# Altium PCB Interface-Board-v4.0.PcbDoc (part 3 of 3)
Units mil, origin at the board's own origin, x right, y up, seen from the top; angles counter-clockwise.
Board outline 1665.35 x 1665.35 mil, 4 copper layers (Top Layer, PWR, GND, Bottom Layer), stack 61.654 mil thick; 98 components, 76 nets, 345 pads, 193 vias.
Unrouted connection lines stored in the file: 69.
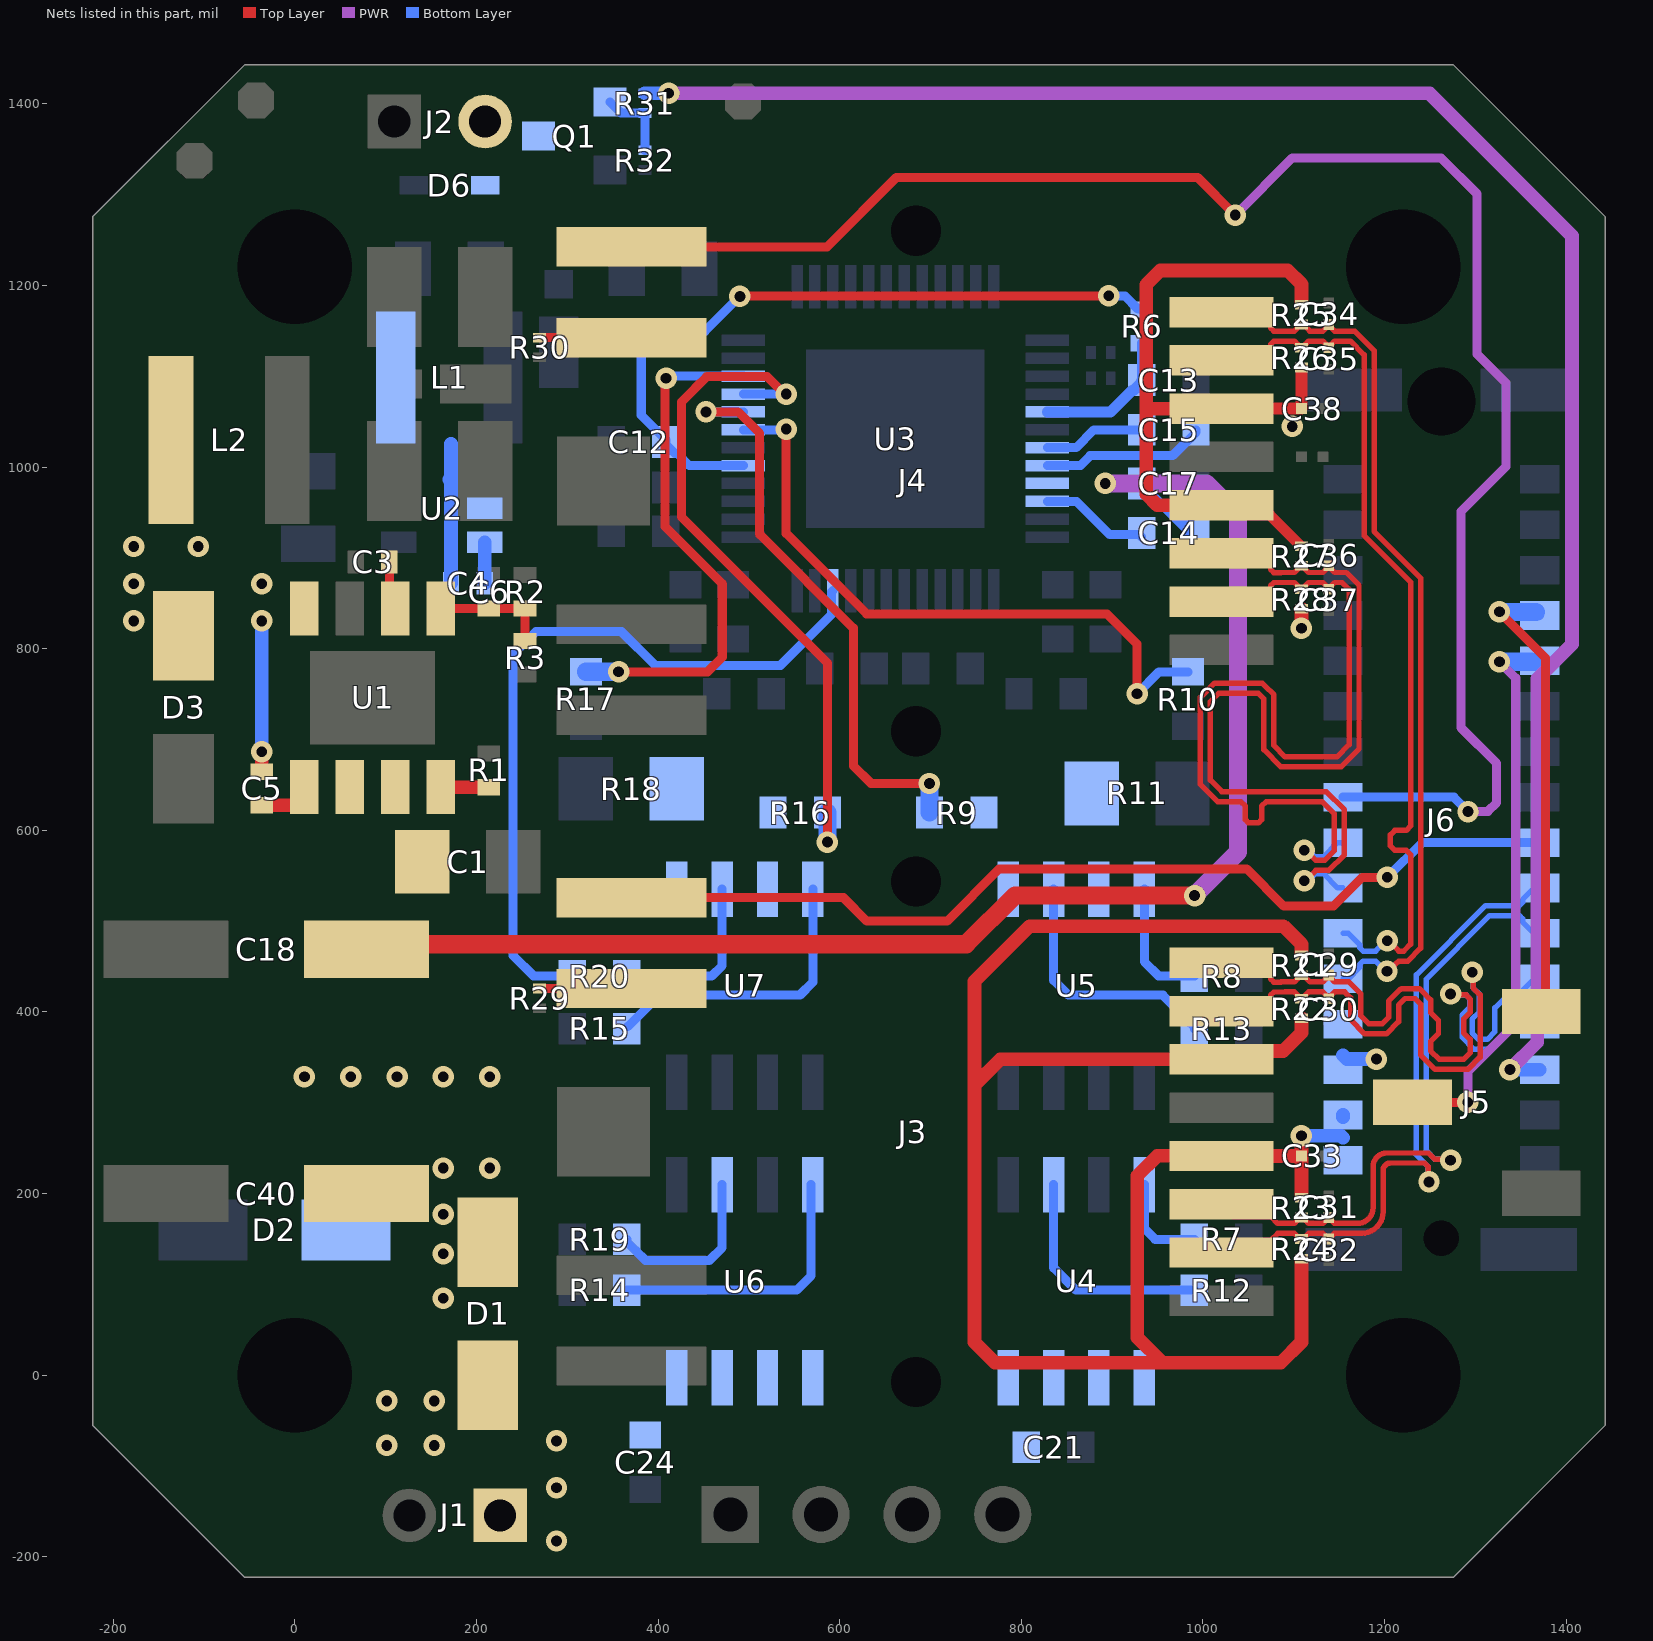
[diagram p4: the nets of this part, all layers, seen from the top]

## Via types
v1: diameter 23.62, hole 11.81, Top Layer to Bottom Layer, tented both sides, 193 vias

## Nets (pads, with @x,y where several pads share a name; then routed paths per layer and width w, separated by ;. In a path a pad name is that pad's centre, name@x,y a point inside that pad or via, vN(x,y) a via of type N, cw(c..) or ccw(c..) an arc to the next point about the centre after c; other vN are vias at no path point) (continued)
LB2: R20.2 U3.46 | length 832.6
  Bottom Layer w10: R20.2@305.56,439.59 262.92,439.59 240.38,462.14 240.38,793.8 265.4,818.82 359.74,818.82 396.96,781.61 534.88,781.61 591.15,837.87 591.15,862.65 U3.46@592.45,863.95
LINK0: J3.9 J6.A8 | length 1080.3
  Top Layer w10: J3.9@370.87,525.87 604.25,525.87 630.04,500.09 718.36,500.09 775.8,557.52 1048.23,557.52 1089.13,516.63 1143.79,516.63 1175.38,548.21 v1(1203.09,548.21)
  Bottom Layer w10: v1(1203.09,548.21) 1241.43,586.56 J6.A8@1370.83,586.56
LINK1: J4.9 J6.B9 | length 1923
  Top Layer w10: J4.9@370.87,1242.59 586.15,1242.59 662.62,1319.06 994.09,1319.06 v1(1035.56,1277.59)
  PWR w10: v1(1035.56,1277.59) 1098.56,1340.59 1262.1,1340.59 1301.92,1300.77 1301.92,1124.51 1333.89,1092.55 1333.89,1000.77 1284.06,950.94 1284.06,713.23 1323.48,673.81 1323.48,630.51 1313.78,620.81 1292.12,620.81 v1(1291.99,620.67)
  Bottom Layer w10: J6.B9@1154.29,636.56 1154.33,636.59 1276.34,636.59 1291.99,620.94 v1(1291.99,620.67)
NetC3_2: C3.2 U1.6 | length 59
  Top Layer w10: C3.2@104.06,900.59 104.06,850.75 U1.6@110.56,844.25
NetC4_1: C4.1 U2.6 | length 45.3
  Bottom Layer w15: C4.1@209.05,872.04 U2.6@209.05,917.32
NetC4_2: C4.2 L1.1 U2.5 | length 156.3
  Bottom Layer w15: 170.19,986.4 172.05,984.54 ; C4.2@172.05,872.04 172.05,984.54 ; 172.05,1025.76 172.05,984.54
NetC5_1: C5.1 U1.1 | length 60.7
  Top Layer w15: C5.1@-36.44,627.59 -0.23,627.59 10.56,638.38 U1.1@10.56,647.59
NetC5_2: C5.2 D3.1 L2.1 U1.8 | length 166
  Top Layer w15: C5.2@-36.44,664.59 v1(-36.44,686.59)
  Bottom Layer w15: v1(-36.44,686.59) v1(-36.44,830.59)
  other v1: -177.44,830.59 -177.44,871.59 -36.44,871.59 -177.44,912.59 -106.44,912.59
NetC6_1: C6.1 R2.1 R3.2 U1.5 | length 128.7
  Top Layer w10: U1.5@160.56,844.25 C6.1@213.56,844.25 R2.1@253.56,844.25 R3.2@253.56,808.59
NetC12_2: C12.2 R6.1 U3.5 | length 794.6
  Top Layer w10: v1@490.14,1188.3 895.89,1188.3 v1(896.23,1188.64)
  Bottom Layer w10: v1(490.14,1187.96) 451.59,1149.41 396.42,1149.41 381.46,1134.46 381.46,1057.32 408.7,1030.08 408.7,1025.08 418.56,1015.23 421.06,1015.23 434.54,1001.74 U3.5@494.02,1001.74 ; v1(896.23,1188.64) 896.34,1188.53 914.12,1188.53 928.57,1174.08 R6.1@932.07,1174.08
NetC13_2: C13.2 R6.2 U3.29 | length 159.7
  Bottom Layer w10: C13.2@932.56,1095.84 R6.2@932.56,1136.59
  Bottom Layer w12: U3.29@828.67,1060.8 898.41,1060.8 921.95,1084.34 923.56,1084.34 932.56,1093.34 C13.2@932.56,1094.95
NetC14_1: C14.1 U3.34 | length 120.2
  Bottom Layer w10: U3.34@828.67,962.37 860.67,962.37 897.44,925.59 929.97,925.59 C14.1@932.56,923
NetC15_1: C15.1 U3.31 | length 112
  Bottom Layer w10: U3.31@828.67,1021.43 860.36,1021.43 880.04,1041.11 C15.1@932.56,1041.11
NetC15_2: C15.2 U3.32 | length 181.7
  Bottom Layer w10: U3.32@828.67,1001.74 865,1001.74 875.85,1012.59 966.54,1012.59 992.56,1038.61 C15.2@992.56,1041.11
NetJ3_10: J3.10 R29.2 | length 101.3
  Top Layer w10: R29.2@269.54,425.87 J3.10@370.87,425.87
NetJ4_10: J4.10 R30.2 | length 101.3
  Top Layer w10: R30.2@269.54,1142.59 J4.10@370.87,1142.59
NetQ1_1: Q1.1 R31.2 R32.2 | length 82.7
  Bottom Layer w10: Q1.1@347.3,1401.99 358.44,1390.85 359.35,1389.94 R31.2@385.56,1389.94 ; R32.2@385.56,1348.84 R31.2@385.56,1388.25
NetR1_2: R1.2 U1.4 | length 53
  Top Layer w15: U1.4@160.56,647.59 R1.2@213.56,647.59
NetR7_2: R7.2 U4.4 | length 108.3
  Bottom Layer w10: U4.4@935.56,209.89 935.56,161.59 947.56,149.59 R7.2@990.56,149.59
NetR8_2: R8.2 U5.4 | length 141.4
  Bottom Layer w10: U5.4@935.56,535.19 935.56,455.35 951.31,439.59 R8.2@990.56,439.59
NetR9_2: R9.2 R11.2 U5.1 U5.3
NetR12_1: R12.1 U4.2 | length 256.8
  Bottom Layer w10: U4.2@835.56,209.89 835.56,118.29 860.25,93.59 R12.1@990.56,93.59
NetR13_1: R13.1 U5.2 | length 278.9
  Bottom Layer w10: U5.2@835.56,535.19 835.56,434.92 852.01,418.47 956.02,418.47 990.56,383.93 R13.1@990.56,381.43
NetR14_2: R14.2 U6.4 | length 309.9
  Bottom Layer w10: R14.2@365.56,93.59 552.59,93.59 568.56,109.56 U6.4@568.56,209.89
NetR15_2: R15.2 U7.4 | length 326.5
  Bottom Layer w10: R15.2@366.56,383.93 401.34,418.71 556.33,418.71 570.56,432.94 U7.4@570.56,535.19
NetR16_2: R16.2 R18.2 U7.1 U7.3
NetR19_1: R19.1 U6.2 | length 191.4
  Bottom Layer w10: R19.1@365.56,149.59 365.56,147.09 R19.1@375.56,137.09 ; R19.1@375.58,137.09 386.36,126.31 456.42,126.31 470.56,140.45 U6.2@470.56,209.89
NetR20_1: R20.1 U7.2 | length 193.9
  Bottom Layer w10: R20.1@365.56,439.59 459.06,439.59 470.56,451.09 U7.2@470.56,535.19
PUMP: J6.A3 R31.1 | length 2065.1
  PWR w15: v1(411.56,1411.59) 1249.64,1411.59 1406.56,1254.68 1406.56,804.95 1368.35,766.74 1368.35,366.74 v1(1338.16,336.56)
  Bottom Layer w15: R31.1@385.56,1411.59 v1(411.56,1411.59) ; v1(1338.16,336.56) J6.A3@1370.83,336.56
PUMP-PWM: D6.1 J2.2 Q1.3
RXA_N: C32.1 J3.7 J6.A7 R24.2 | length 741.1
  Top Layer w6: J3.7@1020.47,135.13 1034.2,148.86 1075.13,148.86 1082.48,156.2 1090.5,156.2 1090.55,156.25 1100.76,156.25 1104.27,152.74 1104.27,152.24 1106.59,149.92 R24.2@1108.56,149.92 1110.53,149.92 1112.84,152.24 1112.84,152.74 1116.36,156.25 1132.23,156.25 C32.1@1138.56,149.92 1144.89,156.25 1174.86,156.25 ccw(c1174.86,179.85) 1198.46,179.85 1198.46,225.25 cw(c1206.86,225.25) 1206.86,233.65 1244.14,233.65 1247.97,229.81 1247.97,213.82 v1(1249.01,212.78)
  Bottom Layer w6: v1(1249.01,212.78) 1247.97,213.82 1247.97,229.81 1235.08,242.71 1235.08,440.82 1311.32,517.06 1348.66,517.06 1352.17,520.57 1352.17,523.81 1364.92,536.56 J6.A7@1370.83,536.56
RXA_P: C31.1 J3.6 J6.A6 R23.2 | length 722.9
  Top Layer w6: J3.6@1020.47,188.28 1034.2,174.54 1074.98,174.54 1082.27,167.25 1100.76,167.25 1104.27,170.77 1104.27,171.27 1106.59,173.58 R23.2@1108.56,173.58 1110.53,173.58 1112.84,171.27 1112.84,170.77 1116.36,167.25 1132.23,167.25 C31.1@1138.56,173.58 1144.89,167.25 1170.31,167.25 ccw(c1170.31,184.41) 1187.46,184.41 1187.46,229.81 cw(c1202.3,229.81) 1202.3,244.65 1248.7,244.65 1255.75,237.59 1271.75,237.59 v1(1272.78,236.56)
  Bottom Layer w6: v1(1272.78,236.56) 1271.75,237.59 1255.75,237.59 1246.08,247.26 1246.08,436.26 1315.88,506.06 1348.66,506.06 1352.17,502.54 1352.17,499.3 1364.92,486.56 J6.A6@1370.83,486.56
RXB_N: C37.1 J4.7 J6.B8 R28.2 | length 1011.3
  Top Layer w6: J4.7@1020.47,851.84 1060.83,851.84 1074.56,865.58 1074.56,869.4 1078.07,872.92 1090.5,872.92 1100.76,872.93 1104.27,869.41 1104.27,867.91 1106.59,865.59 R28.2@1108.56,865.59 1110.53,865.59 1112.84,867.91 1112.84,869.41 1116.36,872.93 1132.14,872.93 1135.65,869.41 1135.65,868.5 C37.1@1138.56,865.59 1141.46,868.5 1141.46,869.41 1144.98,872.93 1153.46,872.93 1160.95,865.44 1160.95,694.27 1147.68,681 1090.5,681 1078.07,693.42 1078.07,749.43 1068.6,758.9 1065.38,762.12 1012.96,762.12 997.23,746.4 997.23,650.66 1016.25,631.64 1041.65,631.64 1046.68,626.62 1046.68,611.82 1050.19,608.3 1061.26,608.3 1064.78,611.82 1064.78,626.55 1069.87,631.64 1131.27,631.64 1144.74,618.17 1144.74,577.66 1133.98,566.9 1124.34,566.9 1113.02,578.21 v1(1111.56,578.21)
  Bottom Layer w6: v1(1111.56,578.21) 1116.33,578.21 1123.73,570.81 1132.64,570.81 1148.39,586.56 J6.B8@1154.29,586.56
RXB_P: C36.1 J4.6 J6.B7 R27.2 | length 1011.3
  Top Layer w6: J4.6@1020.47,904.99 1060.83,904.99 1074.56,891.26 1074.56,887.43 1078.07,883.92 1085.94,883.92 1100.76,883.93 1104.27,887.44 1104.27,888.95 1106.59,891.26 R27.2@1108.56,891.26 1110.53,891.26 1112.84,888.95 1112.84,887.44 1116.36,883.93 1132.14,883.93 1135.65,887.44 1135.65,888.36 C36.1@1138.56,891.26 1141.46,888.36 1141.46,887.44 1144.98,883.93 1158.02,883.93 1171.95,869.99 1171.95,689.71 1152.24,670 1085.94,670 1067.07,688.87 1067.07,744.88 1060.83,751.12 1017.52,751.12 1008.23,741.84 1008.23,655.21 1020.81,642.64 1053.31,642.64 1135.82,642.64 1155.74,622.72 1155.74,573.1 1138.54,555.9 1124.34,555.9 1113.02,544.59 v1(1111.56,544.59)
  Bottom Layer w6: v1(1111.56,544.59) 1116.17,544.59 1123.88,552.3 1132.64,552.3 1148.39,536.56 J6.B7@1154.29,536.56
SRAH: R9.1 U3.8 | length 642.8
  Top Layer w10: v1(452.79,1060.8) 488.18,1060.8 511.79,1037.19 511.79,926.08 615.16,822.71 615.16,670.99 634.56,651.59 v1(698.86,651.59)
  Bottom Layer w10: v1(452.79,1060.8) U3.8@494.02,1060.8
  Bottom Layer w20: R9.1@698.86,619.59 v1(698.86,651.59)
SRAL: R10.1 U3.7 | length 719.5
  Top Layer w10: v1@541.11,1041.53 541.11,927.06 629.69,838.48 894.2,838.48 927.56,805.13 v1(927.56,750.43)
  Bottom Layer w10: U3.7@494.02,1041.11 540.34,1041.11 v1(541.11,1041.88) ; v1(927.56,750.43) 951.72,774.59 R10.1@983.56,774.59
SRBH: R16.1 U3.9 | length 765.6
  Top Layer w10: v1(541.11,1080.48) 539.39,1080.48 520.15,1099.72 453.68,1099.72 440.56,1086.59 440.56,1086.48 425.98,1071.9 425.98,945.02 586.56,784.44 v1(586.56,587.11)
  Bottom Layer w10: U3.9@494.02,1080.48 v1(541.11,1080.48)
  Bottom Layer w20: v1(586.56,587.11) R16.1@586.56,619.59
SRBL: R17.1 U3.10 | length 576
  Top Layer w10: v1@357.23,774.59 454.5,774.59 470.68,790.77 470.68,871.53 407.56,934.65 407.56,1096.57 v1(408.84,1097.85)
  Bottom Layer w10: v1(408.84,1097.85) 411.16,1100.17 U3.10@494.02,1100.17
  Bottom Layer w20: R17.1@320.56,774.59 v1(356.56,774.59)
TXA_N: C30.1 J3.2 J6.A5 R22.2 | length 734.8
  Top Layer w6: J3.2@1020.47,400.88 1060.83,400.88 1074.56,414.61 1074.56,418.44 1078.07,421.95 1090.5,421.95 1090.65,422.1 1100.76,422.1 1104.27,418.59 1104.27,416.92 1106.59,414.61 R22.2@1108.56,414.61 1110.53,414.61 1112.84,416.92 1112.84,418.58 1116.36,422.1 1132.14,422.1 1135.65,418.58 1135.65,417.51 C30.1@1138.56,414.61 1141.46,417.51 1141.46,418.58 1144.98,422.1 1156.09,422.1 1162.64,415.55 1162.64,391.46 1178.2,375.9 1202.09,375.9 1215.56,389.36 1215.56,407.52 1222.84,414.8 1233.83,414.8 1239.92,408.7 1239.92,352.62 1255.82,336.73 1291.83,336.73 1305.39,350.29 1305.39,388.68 1305.39,418.76 1297.6,426.56 1297.6,442.56 v1(1296.56,443.59)
  Bottom Layer w6: v1(1296.56,443.59) 1297.6,442.56 1297.6,426.56 1304.6,419.56 1304.6,400.14 1296.52,392.06 1296.52,376.81 1303.4,369.93 1313.29,369.93 1321.61,378.24 1321.61,404.43 1334.23,417.06 1348.66,417.06 1352.17,420.57 1352.17,423.81 1364.92,436.56 J6.A5@1370.83,436.56
TXA_P: C29.1 J3.1 J6.A4 R21.2 | length 728.4
  Top Layer w6: J3.1@1020.47,454.02 1060.83,454.02 1074.56,440.29 1074.56,436.46 1078.07,432.95 1085.94,432.95 1086.09,433.1 1100.76,433.1 1104.27,436.61 1104.27,438.28 1106.59,440.59 R21.2@1108.56,440.59 1110.53,440.59 1118.02,433.1 1132.14,433.1 1135.65,436.61 1135.65,437.69 C29.1@1138.56,440.59 1141.46,437.69 1141.46,436.61 1144.98,433.1 1160.65,433.1 1173.64,420.1 1173.64,396.01 1182.76,386.9 1197.53,386.9 1204.56,393.92 1204.56,412.07 1216.71,424.23 ccw(c1202.76,444.75) 1218.78,425.79 1238.38,425.8 1241.61,422.57 1250.92,413.26 1250.92,399.34 1259.46,390.8 1259.46,376.12 1250.92,367.58 1250.92,357.18 1260.37,347.73 1287.27,347.73 1294.39,354.85 1294.39,369.91 1287.27,377.03 1287.27,392.33 1294.39,399.46 1294.39,414.2 1289.82,418.78 1273.82,418.78 v1(1272.78,419.82)
  Bottom Layer w6: v1(1272.78,419.82) 1273.82,418.78 1289.82,418.78 1293.6,415 1293.6,404.7 1285.52,396.62 1285.52,372.26 1298.85,358.93 1317.85,358.93 1332.61,373.68 1332.61,399.88 1338.78,406.06 1348.66,406.06 1352.17,402.54 1352.17,399.3 1364.92,386.56 J6.A4@1370.83,386.56
TXB_N: C35.1 J4.2 J6.B6 R26.2 | length 990.1
  Top Layer w6: J4.2@1020.47,1117.59 1060.83,1117.59 1074.56,1131.32 1074.56,1135.15 1078.07,1138.67 1090.5,1138.67 1100.76,1138.67 1104.27,1135.16 1104.27,1133.66 1106.59,1131.34 R26.2@1108.56,1131.34 1110.53,1131.34 1112.84,1133.66 1112.84,1135.16 1116.36,1138.67 1132.14,1138.67 1135.65,1135.16 1135.65,1134.25 C35.1@1138.56,1131.34 1141.46,1134.25 1141.46,1135.16 1144.98,1138.67 1162.57,1138.67 1177.56,1123.69 1177.56,924.63 1228.92,873.27 1228.92,604.82 1224.06,599.97 1211.46,599.97 1206.42,594.93 1206.42,583 1211.21,578.21 1223.89,578.21 1228.92,573.18 1228.92,474.76 1221.21,467.06 1215.87,467.06 1204.56,478.37 v1(1203.09,478.37)
  Bottom Layer w6: J6.B6@1154.29,486.56 1160.2,486.56 1172.94,473.81 1172.94,470.57 1176.46,467.06 1190.32,467.06 1201.63,478.37 v1(1203.09,478.37)
TXB_P: C34.1 J4.1 J6.B5 R25.2 | length 991.7
  Top Layer w6: J4.1@1020.47,1170.74 1060.83,1170.74 1074.56,1157.01 1074.56,1153.18 1078.07,1149.67 1085.94,1149.67 1100.76,1149.67 1104.27,1153.19 1104.27,1154.69 1106.59,1157.01 R25.2@1108.56,1157.01 1110.53,1157.01 1117.86,1149.67 1132.14,1149.67 1135.65,1153.19 1135.65,1154.1 C34.1@1138.56,1157.01 1141.46,1154.1 1141.46,1153.19 1144.98,1149.67 1167.13,1149.67 1188.56,1128.24 1188.56,929.18 1239.92,877.82 1239.92,470.21 1225.77,456.06 1215.87,456.06 v1(1202.76,444.75)
  Bottom Layer w6: J6.B5@1154.29,436.56 1160.2,436.56 1172.94,449.3 1172.94,452.54 1176.46,456.06 1190.32,456.06 1201.62,444.75 v1(1202.76,444.75)
UART-RX: J5.1 J6.A13 | length 509
  Top Layer w10: v1(1326.56,840.59) 1377.19,789.96 1377.19,405.17 J5.1@1372.5,400.48
  Bottom Layer w10: J6.A13@1366.79,840.59 J6.A13@1370.83,836.56
  Bottom Layer w20: v1(1326.56,840.59) J6.A13@1366.79,840.59
UART-TX: J5.2 J6.A12 | length 620.3
  Top Layer w10: J5.2@1230.88,300.59 J5.2@1230.77,300.48 v1(1291.83,300.48)
  PWR w10: v1(1291.83,300.48) 1291.83,334.28 1344.56,387.01 1344.56,767.59 v1(1326.56,785.59)
  Bottom Layer w10: J6.A12@1369.86,785.59 J6.A12@1370.83,786.56
  Bottom Layer w20: v1(1326.56,785.59) J6.A12@1369.86,785.59
VDDTXRX1: C33.1 J3.3 J3.5 J6.B1 J6.B2 R21.1 R22.1 R23.1 R24.1 | length 2190.8
  Top Layer w15: J3.5@1020.47,241.43 C33.1@1108.56,241.43 ; J3.5@1020.47,241.43 949.67,241.46 927.81,219.6 927.81,41.56 955.78,13.59 ; R24.1@1108.56,125.27 1108.56,36.5 1085.65,13.59 955.78,13.59 ; R23.1@1108.56,197.99 C33.1@1108.56,241.43 ; v1(1108.56,263.59) C33.1@1108.56,241.43 ; R22.1@1108.56,392.95 1108.56,377.07 1088.45,356.96 1029.7,356.96 J3.3@1020.47,347.73 776.81,347.73 748.56,319.47 ; R21.1@1108.56,464.63 1108.56,474.71 1088.68,494.59 809.39,494.59 748.56,433.76 748.56,319.47 ; 748.56,319.47 748.56,36.15 771.12,13.59 955.78,13.59
  Bottom Layer w10: J6.B2@1154.29,286.56 J6.B2@1154.33,286.59
  Bottom Layer w15: v1(1108.56,263.59) 1152.25,263.59 1154.29,261.56 ; J6.B2@1154.33,283.92 J6.B2@1154.33,286.59
VDDTXRX2: C38.1 J4.3 J4.5 J6.B3 J6.B4 R25.1 R26.1 R27.1 R28.1 | length 906
  Top Layer w12: J4.5@1020.47,958.14 1031.2,947.41 1073.71,947.41 1107.27,913.84 R27.1@1107.27,913.6
  Top Layer w13: J4.3@1020.47,1064.44 C38.1@1108.56,1064.44 R26.1@1108.56,1107
  Top Layer w15: J4.5@1020.47,958.14 949.61,958.14 937.56,970.2 937.56,1064.44 ; J4.3@1020.47,1064.44 937.56,1064.44 ; v1(1098.49,1044.83) 1098.49,1047.16 v1@1100.4,1049.07 ; v1(1108.56,822.59) R28.1@1108.56,843.94 ; R25.1@1108.56,1181.86 1108.56,1201.59 1093.56,1216.59 953.13,1216.59 937.56,1201.02 937.56,1064.44
  Bottom Layer w15: 1154.29,352.3 1158.45,348.15 v1(1191.1,348.15)
VIN: D1.2 J1.1
  other v1: 288.19,-182.64 288.19,-123.85 101.25,-77.4 153.56,-77.4 288.19,-72.41 101.25,-28.41 153.56,-28.41
VM: C1.2 C14.2 C17.2 C18.1 C21.1 C24.1 C40.1 D1.1 D2.1 U1.2 U1.3 U3.33 U4.5 U4.6 U4.7 U4.8 U6.5 U6.6 U6.7 U6.8 | length 1613.7
  Top Layer w20: C18.1@101.03,474.59 739.34,474.59 792.96,528.21 v1(990.87,528.21)
  PWR w20: v1(892.61,982.06) 1003.74,982.06 1038.69,947.11 1038.69,576.04 v1(990.87,528.21)
  Bottom Layer w10: C17.2@932.56,982.06 932.56,979.56 942.56,969.56 943.98,969.56 982.49,931.05 C14.2@982.49,923.01 ; 963.24,950.31 C14.2@982.56,940.09
  other v1: 163.56,84.6 163.56,133.59 163.56,177.07 163.56,228.06 214.54,228.06 10.61,328.59 61.59,328.59 112.57,328.59 163.56,328.59 214.54,328.59
pads on no net: J3.11 J3.12 J3.MH1 J3.MH2 J4.11 J4.12 J4.MH1 J4.MH2 J6.A16 J6.B16 J6.MH J6.MH1 U3.25

## Polygon pours and split planes (outlines as drawn)
BMA1 on Bottom Layer "BMA1_L04_P007" (solid, pour order 7): 952.56,247.4 916.75,247.4 916.75,144.59 861.56,144.59 861.56,386.74 873.75,398.93 940.22,398.93 952.56,386.59
VM on Bottom Layer "VM_L04_P023" (solid, pour order 23): 350.91,-96.91 253.41,0.59 80.56,0.59 20.74,60.41 -6.68,60.41 -6.68,378.09 189.56,378.09 255.56,312.09 255.56,88.59 275.56,68.59 975.56,68.59 975.56,-49.41 825.56,-49.41 825.56,-96.91 405,-96.91
GND on Bottom Layer "GND_L04_P040" (solid, remove dead copper, pour order 40): -222.44,-55.41 -55.41,-222.44 1275.88,-222.44 1442.91,-55.41 1442.91,1275.88 1275.88,1442.91 -55.41,1442.91 -222.44,1275.88
VIN on Bottom Layer "VIN_L04_P032" (solid, pour order 32): 249.41,-9.41 350.91,-110.91 350.91,-204.41 187.56,-204.41 187.56,-104.41 73.79,-104.41 73.79,-9.41
3V3 on Bottom Layer "	" (solid, pour order 26): 190.19,1248.59 190.19,1025.76 256,1025.76 256,1173 264.39,1181.39 406,1181.39 406,1248.59
NetC4_2 on Bottom Layer "NETC4_2_L04_P025" (solid, pour order 25): 243.37,970.59 243.37,937.59 142.56,937.59 142.56,1025.76 89.48,1025.76 89.48,1171.43 182,1171.43 182,970.59
12V on Bottom Layer "12V_L04_P024" (solid, pour order 24): 79,1015.59 79,1173.75 94.87,1188.59 94.87,1280.16 109.16,1294.45 146.57,1294.45 146.57,1442.91 -36.32,1442.91 -222.44,1256.8 -222.44,1128 -77.44,1128 -77.44,975.59 22.56,975.59 50.22,947.93 58.15,940 134.24,940 134.24,1015.59
3V3 on Bottom Layer "3V3_L04_P018" (solid, pour order 18): 756,1230.25 740.25,1230.25 736.54,1226.54 736.54,1174.58 684.57,1174.58 684.57,1226.54 699.54,1226.54 717,1244 717,1277 704.26,1289.74 704.26,1306.76 756,1306.76
12V on Bottom Layer "12V_L04_P017" (solid, pour order 17): 452.78,956.07 445.69,948.99 445.69,929.69 427.8,911.8 393.56,911.8 393.56,988.36 450.63,988.36 518.04,988.36 518.04,956.07
VM on Bottom Layer "VM_L04_P010" (solid, pour order 10): 804.65,975.76 869.36,975.76 880.56,964.56 947.56,964.56 947.56,999.56 879.67,999.56 868.47,988.36 804.65,988.36
NetR9_2 on Bottom Layer "NETR9_2_L04_P009" (solid, pour order 9): 911.35,683.59 829.7,683.59 735.56,683.59 735.56,502.07 745.56,492.07 902.04,492.07 911.35,501.39
NetR16_2 on Bottom Layer "NETR16_2_L04_P008" (solid, pour order 8): 370.56,680.59 370.56,502.07 380.56,492.07 535.67,492.07 546.35,502.75 546.35,680.59 482.37,680.59
BMA2 on Bottom Layer "BMA2_L04_P006" (solid, pour order 6): 852.56,247.4 816.75,247.4 816.75,144.59 761.56,144.59 761.56,386.74 773.75,398.93 840.22,398.93 852.56,386.59
BMB1 on Bottom Layer "BMB1_L04_P001" (solid, pour order 1): 577.56,144.59 587.56,154.59 587.56,386.59 575.22,398.93 508.75,398.93 496.56,386.74 496.56,151.28 503.25,144.59
BMB2 on Bottom Layer "BMB2_L04_P000" (solid, pour order 0): 477.56,144.59 487.56,154.59 487.56,386.59 475.22,398.93 408.75,398.93 396.56,386.74 396.56,151.28 403.25,144.59
12V on PWR "12V_L02_P031" (solid, pour order 31): 202.22,1082.46 233.86,1114.09 482.27,1114.09 513.56,1082.8 513.56,908.92 513.56,803.28 536.58,780.26 536.58,538.12 426.05,427.59 -222.44,427.59 -222.44,1275.88 -55.41,1442.91 158.56,1442.91 158.56,1335.59 115.56,1292.59 115.56,964.4 85.56,934.4 85.56,890.08 106.64,869 179.97,869 202.22,891.25
3V3 on PWR "3V3_L02_P034" (solid, remove dead copper, pour order 34): 192.39,1088.64 230.34,1126.59 484.81,1126.59 526.56,1084.85 526.56,822.83 578.95,822.83 601.56,800.22 601.56,504.59 536.58,439.61 536.58,426.59 1008.56,426.59 1008.56,-222.44 1275.88,-222.44 1442.91,-55.41 1442.91,1275.88 1275.88,1442.91 173.38,1442.91 173.38,1327.42 128.56,1282.59 128.56,962.59 96.56,930.59 96.56,893.59 109.56,880.59 178.56,880.59 192.39,894.42
VM on PWR "VM_L02_P033" (solid, pour order 33): 49.49,31.59 49.49,-199.41 -78.44,-199.41 -222.44,-55.41 -222.44,408.59 350.56,408.59 350.56,31.59
VIN on PWR "VIN_L02_P030" (solid, pour order 30): 350.56,14.59 350.56,-222.44 176.56,-222.44 176.56,-104.41 73.79,-104.41 73.79,14.59
VDDTXRX2 on PWR "VDDTXRX2_L02_P003" (solid, pour order 3): 1141.56,1093.59 1197.39,1037.76 1197.39,863.39 1182,848 1182,395.59 1207.43,395.59 1207.43,320.59 1109.06,320.59 1109.06,487.59 1056.56,487.59 1056.56,663.59 1083.56,690.59 1083.56,1093.59
BMA2 on PWR "BMA2_L02_P028" (solid, pour order 28): 636.56,-222.44 728.49,-222.44 728.49,-102.83 736.32,-95 855.56,-95 855.56,408.59 745.56,408.59 636.56,408.59
BMA1 on PWR "BMA1_L02_P019" (solid, pour order 19): 866.56,-108.14 739.56,-108.14 739.56,-222.44 991.56,-222.44 991.56,408.59 866.56,408.59
BMB1 on PWR "BMB1_L02_P005" (solid, pour order 5): 501.41,-59.26 527.56,-85.41 527.56,-222.44 626.56,-222.44 626.56,408.75 501.41,408.75
BMB2 on PWR "BMB2_L02_P004" (solid, pour order 4): 489.56,408.59 489.56,-64.41 515.56,-90.41 515.56,-222.44 369.56,-222.44 369.56,408.59
VM on Top Layer "VM_L01_P015" (solid, pour order 15): 44.77,593.59 -26.44,593.59 -26.44,55.59 126.56,55.59 274.95,55.59 274.95,255.59 226.06,255.59 226.06,504.22 175.56,504.22 175.56,600.59 126.72,600.59 126.72,676.84 126.35,677.22 44.77,677.22
12V on Top Layer "12V_L01_P021" (solid, pour order 21): -63.33,1121.54 -63.32,929.61 140.56,929.61 140.56,1425.59 40.56,1425.59 40.56,1326.95 -29.28,1326.95 -85.44,1270.79 -85.44,1143.66
GND on Top Layer "GND_L01_P035" (solid, remove dead copper, pour order 35): 420.56,-222.44 420.56,-88.41 842.56,-88.41 842.56,-222.44 1275.88,-222.44 1442.91,-55.41 1442.91,1275.88 1275.88,1442.91 -55.41,1442.91 -222.44,1275.88 -222.44,-55.41 -55.41,-222.44
VIN on Top Layer "VIN_L01_P022" (solid, pour order 22): 275.01,-34.41 313.56,-34.41 313.56,-222.44 187.56,-222.44 187.56,-104.41 73.79,-104.41 73.79,38.06 275.01,38.06
GND on Top Layer "GND_L01_P020" (solid, pour order 20): -61.44,607.64 -192.52,607.64 -192.52,749.59 -81.44,749.59 -73.44,757.59 -73.44,797.36 224.29,797.36 241.06,780.59 273.56,780.59 273.56,675.59 193.56,675.59 193.56,694.48 -6.33,694.48 -22.44,710.59 -50.44,710.59 -61.44,699.59
GND on GND "GND_L03_P038" (solid, pour order 38): -222.44,-55.41 -55.41,-222.44 1275.88,-222.44 1442.91,-55.41 1442.91,1275.88 1275.88,1442.91 -55.41,1442.91 -222.44,1275.88

## Other copper
Top Layer:
  rectangle net VDDTXRX2: 1085.95,1032.59 1109.56,1071.59
  rectangle net 3V3: 317,1171.59 453.54,1212.59
  rectangle net GND: 67.87,-199.41 179.4,-112.56
  rectangle net BMB2: 435.56,-204.41 525.56,-106.41
  rectangle net BMB1: 535.56,-204.41 625.56,-106.41
  rectangle net BMA2: 635.56,-204.41 725.56,-106.41
  rectangle net BMA1: 735.56,-204.41 825.56,-106.41
  rectangle net VIN: 187.56,-199.41 288.19,-72.41
  rectangle net 12V: 40.56,1311.59 140.56,1425.59
  rectangle net NetC5_2: -212.25,765.12 -93.47,1135.99
  rectangle net NetC5_2: -192.52,809 26.35,885
  pour cut-out: 281.19,500.39 281.19,491.92 324,491.92 324,500.39
  pour cut-out: -55.41,655.59 -55.41,592.79 -23.94,592.79 -23.94,655.59
  pour cut-out: 199.82,872.92 199.82,853.23 273.06,853.23 273.06,872.92
  pour cut-out: 956.76,940.94 956.76,921.25 1084.56,921.25 1084.56,940.94
  pour cut-out: 956.76,887.79 956.76,868.1 1084.56,868.1 1084.56,887.79
  pour cut-out: 956.76,834.64 956.76,814.95 1084.56,814.95 1084.56,834.64
  pour cut-out: -93.47,1142.7 -88.72,1142.7 -88.72,1168.49 -93.47,1168.49
  pour cut-out: 394,404 394,135 600,135 600,404
  pour cut-out: 281.19,1171.25 308.06,1171.25 308.06,1212.59 281.19,1212.59
  pour cut-out: -83.84,1117.76 -64.16,1117.76 -64.16,1143.56 -83.68,1143.56 -83.84,1143.72
  pour cut-out: -83.01,922 -63.32,922 -63.32,961.37 -82.84,961.37 -83.01,961.54
  pour cut-out: 1057.42,277.44 1057.42,257.76 1083.21,257.76 1083.21,277.28 1083.38,277.44
  pour cut-out: 957.76,277.52 957.76,257.83 983.56,257.83 983.56,277.35 983.73,277.52
  pour cut-out: 956.76,330.52 956.76,310.83 1084.56,310.83 1084.56,330.52
  pour cut-out: 956.43,534.51 956.43,477.29 982.4,477.29 982.4,534.51
  pour cut-out: 955.85,437.76 955.85,418.07 981.64,418.07 981.64,437.59 981.81,437.76
  pour cut-out: 279.43,-18.07 279.43,-32.79 309.49,-32.79 322.04,-32.79 322.04,-18.07
  pour cut-out: 460.54,81.47 460.54,38.78 420.56,38.78 420.56,81.47
PWR:
  rectangle net NetC5_2: -189.44,807 -17.95,886
  rectangle net NetC5_2: -189.44,807 -93.88,935.73
  rectangle net BMB1: 534.91,-204.25 626.56,-77.25
  rectangle net BMA2: 636.56,-204.41 728.49,-77.41
  rectangle net VIN: 176.56,-199.41 288.19,-72.41
  rectangle net 12V: 48.72,1335.59 158.56,1427.59
  rectangle net BMA1: 739.56,-204.41 855.06,-108.14
  rectangle net BMB2: 385.56,-204.41 515.56,-90.25
  pour cut-out: -187.44,606 -50.65,606 -50.65,563 -187.44,563
  pour cut-out: -187.44,545 -50.65,545 -50.65,502 -187.44,502
  pour cut-out: -187.44,427 -50.65,427 -50.65,384 -187.44,384
  pour cut-out: -187.44,274 -50.65,274 -50.65,231 -187.44,231
  pour cut-out: -93.88,943.89 -10,943.89 -10,798.84 -93.88,798.84
  pour cut-out: -58,-108 85,-108 85,-199.41 -58,-199.41
GND:
  rectangle net GND: 61.55,-192.41 186.6,-112.39
  pour cut-out: -58.58,809.15 -58.58,886.19 -14.32,886.19 -14.32,808.41
  pour cut-out: -199.58,809.15 -199.58,953.03 -155.32,953.03 -155.32,808.41
  pour cut-out: 364.11,1220.73 452.79,1220.73 452.79,1176.47 363.38,1176.47
  pour cut-out: 79.8,-55.26 172,-55.26 172,-99.52 79.07,-99.52
  pour cut-out: 79.8,-6.27 172.63,-6.27 172.63,-50.53 79.07,-50.53
  pour cut-out: 310.32,-50.96 310.32,-194.85 266.07,-194.85 266.07,-50.23
  pour cut-out: 142.11,250.19 236.35,250.19 236.35,205.94 141.38,205.94
  pour cut-out: 185.69,249.5 185.69,56.25 141.44,56.25 141.44,250.23
  pour cut-out: 399.11,179.73 543,179.73 543,135.47 398.38,135.47
  pour cut-out: 764.11,179.73 908,179.73 908,135.47 763.38,135.47
  pour cut-out: 764.11,291.73 957.37,291.73 957.37,247.47 763.38,247.47
  pour cut-out: 764.11,403.57 957.37,403.57 957.37,359.32 763.38,359.32
  pour cut-out: 399.11,291.73 592.37,291.73 592.37,247.47 398.38,247.47
  pour cut-out: 399.11,403.57 592.37,403.57 592.37,359.32 398.38,359.32
  pour cut-out: -9.04,351.57 234.59,351.57 234.59,307.32 -9.78,307.32
  pour cut-out: 85.13,1176.63 85.13,933 40.87,933 40.87,1177.37
  pour cut-out: 435.56,-200.41 435.56,-101.41 827.56,-101.41 827.56,-200.41
Bottom Layer:
  rectangle net 3V3: 94.87,883.13 148.94,911.43
  rectangle net 3V3: 94.87,883.13 134.24,929.13
  rectangle net NetC4_2: 142.56,921.63 182.36,1005.15
  rectangle net NetC5_2: -192.44,822 -15.44,886
  rectangle net GND: 921.41,580.46 1007.56,683.59
  rectangle net BMB2: 435.56,-204.41 525.56,-112.41
  rectangle net BMB1: 535.56,-204.41 625.56,-112.41
  rectangle net BMA2: 635.56,-204.41 725.56,-112.41
  rectangle net BMA1: 735.56,-204.41 825.56,-112.41
  rectangle net GND: -55.41,-199.41 174.4,-114.88
  rectangle net GND: -77.44,895.59 44.56,935.59
  rectangle net GND: 278.8,548.59 353.29,680.59
  rectangle net VIN: 187.56,-199.41 288.19,-72.41
  rectangle net PUMP-PWM: 170.19,1294.45 287.67,1432.72
  rectangle net 12V: 48.72,1294.45 146.57,1425.59
  rectangle net NetC5_2: -212.25,794 -89.44,1116
  rectangle net VDDTXRX1: 1132.64,220.81 1175.94,302.3
  rectangle net GND: 1132.64,770.81 1212.56,852.3
  rectangle net VDDTXRX2: 1132.64,320.81 1175.94,402.3
  rectangle net 3V3: 1314.6,220.81 1392.48,302.3
  pour cut-out: 947.56,1024.83 977.56,1024.83 977.56,1065.61 954.56,1065.61 954.56,1203.5 947.56,1203.5
  pour cut-out: 146.57,1294.61 146.57,1286.29 170.19,1286.29 170.19,1294.61
  pour cut-out: -77.44,982.6 -77.44,894.16 -87.5,894.16 -87.5,982.6 -87.5,943.6 -87.5,982.6
  pour cut-out: 1132.78,1278.12 1219.22,1278.12 1219.22,1307.31 1132.78,1307.31
  pour cut-out: 94.87,880.5 151.39,880.5 151.39,873 94.87,873
  pour cut-out: 99.87,931.84 99.87,873 86.94,873 86.94,931.84
  pour cut-out: 93.61,931.84 54.61,931.84 54.61,938.06 93.61,938.06 54.61,938.06 93.61,938.06
  pour cut-out: 190,822.47 190,891.53 195,891.53 195,852.53 195,891.53 195,822.47
  pour cut-out: 252.15,966.68 252.15,873 244.96,873 244.96,966.68
  pour cut-out: 825.56,-212.25 825.56,-96.91 844.75,-96.91 844.75,-212.25
  pour cut-out: 427.4,-105.06 427.4,-212.25 415.56,-212.25 415.56,-105.06
  pour cut-out: 362.4,683.73 386.39,683.73 386.39,717.59 362.4,717.59
  pour cut-out: 911.35,691.9 911.35,535.19 921.57,535.19 921.57,691.9
  pour cut-out: 1325.73,1158.64 1412.16,1158.64 1412.16,1187.84 1325.73,1187.84

## Silkscreen, mask and mechanical layers (free items; w line width, h text height)
Top Overlay:
  rectangle: 276.13,-176.89 289,-129
  lines w5: 1118.56,203.42 1118.56,218.59 1088.56,218.59 1088.56,93.94 1141.21,93.94 ; 1138.56,206.4 1138.56,218.59 1190.32,218.59 1190.32,183.93 ; 1140.56,1196.68 1140.56,1229.62 ; 1141.37,117.13 1141.21,116.97 1141.21,93.94 ; 1158.74,568.59 1158.74,480.92 ; 1181.98,192.27 1190.32,183.93 ; 1198.65,192.27 1190.32,183.93 ; 1300.98,93.94 1141.21,93.94 ; 1323.97,960.59 1158.74,960.59 1158.74,931.59 ; 1140.56,1229.62 1140.56,1435.59 1048.56,1435.59 1048.56,1229.62 1140.56,1229.62 ; 1158.74,480.92 1158.74,373.92 1088.16,373.92 1088.16,480.92 1158.74,480.92 ; 1158.74,931.59 1088.16,931.59 1088.16,824.59 1158.74,824.59 1158.74,931.59 ; 1087.54,1091.59 1158.12,1091.59 1158.12,1196.68 1087.54,1196.68 1087.54,1091.59 ; 1135.97,568.59 1229.56,568.59 1229.56,747.59 1135.97,747.59 1135.97,568.59 ; 1300.98,-71.95 1397.98,-71.95 1397.98,34.06 1354,34.06 1354,123.59 1300.98,123.59 1300.98,-71.95 ; 1323.97,940.59 1323.97,1123.59 1417.56,1123.59 1417.56,940.59 1323.97,940.59
  text "3V3" at 527.66,1391.16 h39.37
  text "-" at 272.49,1362.26 h78.74
  text "+" at 22.64,1355.73 h78.74
  text "RJ45-B" at 352.67,1308.26 h59.06
  text "12V" at -22.33,1305.06 h39.37 r90
  text "PUMP-12V" at 40.28,1285.23 h51.18
  text "GND" at -88.93,1223.62 h39.37 r90
  text "RJ45-A" at 352.67,591.26 h59.06
  text "TX" at 1410.46,437.11 h39.37 r90
  text "RX" at 1173.95,277.23 h39.37 r90
  text "+" at 213.44,-102.09 h39.37
  text "B2" at 449.69,-101.67 h39.37
  text "B1" at 549.69,-101.67 h39.37
  text "A2" at 648.4,-101.67 h39.37
  text "A1" at 749.69,-101.67 h39.37
  text "PWR" at 285.49,-176.89 h47.24
  text "MOTOR OUT" at 832.63,-189.84 h47.24
Bottom Overlay:
  lines w5: 46.28,1329.84 54.04,1337.6 ; 54.04,1310.08 99.35,1310.08 ; 54.04,1310.21 54.04,1337.6 ; 61.8,1329.84 54.04,1337.6 ; 100.36,1052.78 88.56,1052.78 88.56,1252.59 127.89,1252.59 ; 224.36,1252.59 260.52,1252.59 473.56,1252.59 ; 240.02,1052.78 296.56,1052.54 296.56,1086.59 385.56,1086.59 385.56,1177.27 ; 329.56,908.3 320.56,908.3 320.56,1057.59 334.56,1057.59 ; 363.56,1057.59 434.56,1057.59 434.56,908.53 427.56,908.53 ; 395.56,1357.02 422.33,1357.02 ; 395.56,1391.81 501.73,1391.81 ; 413.56,1365.79 422.33,1357.02 ; 413.97,1348.66 422.33,1357.02 ; 493.56,1383.64 501.73,1391.81 ; 493.56,1399.98 501.73,1391.81 ; 503.56,791.59 375.2,791.59 375.2,897.59 503.56,897.59 503.56,889.59 ; 819.16,791.59 947.51,791.59 947.51,897.59 819.16,897.59 819.16,889.59 ; 837.9,1167.17 837.9,1180.14 ; 850.87,1180.14 837.9,1180.14 ; 862.47,1254.59 871.56,1263.68 ; 868.7,1103.87 859.85,1112.72 859.85,1158.19 837.9,1180.14 ; 871.56,1136.15 871.56,1263.68 ; 880.56,1254.68 871.56,1263.68 ; 1011.56,1052.56 1063.78,1052.56 1063.78,1097.47 1065.49,1099.17 1087.55,1121.23 ; 1051.22,43.54 1060.01,34.75 ; 1060.01,34.83 1060.01,34.75 ; 1060.01,70.23 1060.01,34.75 ; 1068.79,43.54 1060.01,34.75 ; 1074.58,1121.23 1087.55,1121.23 ; 1087.55,1108.26 1087.55,1121.23 ; -187.44,1052.59 -187.44,1155.59 -21.29,1155.59 -21.29,1052.59 -187.44,1052.59 ; -169.44,657.59 -169.44,788.59 -79.44,788.59 -79.44,657.59 -169.44,657.59 ; 5.56,384.59 106.57,384.59 106.57,476.59 5.56,476.59 5.56,384.59 ; 5.56,523.59 106.57,523.59 106.57,617.59 5.56,617.59 5.56,523.59 ; 435.91,720.2 573.56,720.2 573.56,747.94 748.21,747.94 748.21,720.2 887.62,720.2 887.62,780.99 774.38,780.99 774.38,810.59 543.61,810.59 543.61,781.69 435.91,781.69 435.91,720.2 ; 683.86,1331.59 805.35,1331.59 805.35,1372.38 990.56,1372.38 990.56,1331.59 1113.56,1331.59 1113.56,1394.59 1013.56,1394.59 1013.56,1433.59 784.56,1433.59 784.56,1394.59 683.86,1394.59 683.86,1331.59
  text "3" at 677.12,1344.95 h59.06
  text "*" at 392.42,1128.23 h59.06
  text "*" at -14.8,1085.94 h59.06
  text "~" at 327.1,1011.95 h59.06 r90
  text "2" at 980.09,856.28 h59.06
  text "1" at 374.74,851.63 h59.06
  text "~" at -48.88,745.91 h59.06 r90
  text "3" at 429.17,732.04 h59.06
  text "1" at 3.95,571.55 h59.06
  text "2" at -1.75,435.59 h59.06
  text "Rev-v4.0" at 1253.85,-198.84 h78.74
Board Outline:
  the board outline again, w5
Fabrication:
  drawing of 295 lines, arcs and shapes, not listed
  text "Layer" at 1959.5,1667 h60
  text "Name" at 2369.41,1667 h60
  text "Material" at 3299.16,1667 h60
  text "Thickness" at 4158.92,1667 h60
  text "Constant" at 4808.76,1667 h60
  text "Board Layer Stack" at 5378.62,1667 h60
  text "Top Overlay" at 2369.41,1547 h60
  text "Top Solder" at 2369.41,1427 h60
  text "Solder Resist" at 3299.16,1427 h60
  text "0.018mm" at 4158.92,1427 h60
  text "3.5" at 4808.76,1427 h60
  text "1" at 1959.5,1307 h60
  text "Top Layer" at 2369.41,1307 h60
  text "0.035mm" at 4158.92,1307 h60
  text "Dielectric 2" at 2369.41,1187 h60
  text "PP-006" at 3299.16,1187 h60
  text "0.203mm" at 4158.92,1187 h60
  text "4.4" at 4808.76,1187 h60
  text "2" at 1959.5,1067 h60
  text "PWR" at 2369.41,1067 h60
  text "CF-004" at 3299.16,1067 h60
  text "0.030mm" at 4158.92,1067 h60
  text "Dielectric 1" at 2369.41,947 h60
  text "FR-4" at 3299.16,947 h60
  text "1.030mm" at 4158.92,947 h60
  text "4.6" at 4808.76,947 h60
  text "3" at 1959.5,827 h60
  text "GND" at 2369.41,827 h60
  text "CF-004" at 3299.16,827 h60
  text "0.030mm" at 4158.92,827 h60
  text "Dielectric 3" at 2369.41,707 h60
  text "PP-006" at 3299.16,707 h60
  text "0.203mm" at 4158.92,707 h60
  text "4.4" at 4808.76,707 h60
  text "4" at 1959.5,587 h60
  text "Bottom Layer" at 2369.41,587 h60
  text "0.035mm" at 4158.92,587 h60
  text "Bottom Solder" at 2369.41,467 h60
  text "Solder Resist" at 3299.16,467 h60
  text "0.018mm" at 4158.92,467 h60
  text "3.5" at 4808.76,467 h60
  text "Bottom Overlay" at 2369.41,347 h60
  text "Total board thickness:" at 1959.5,227 h60
  text "1.602mm" at 4158.92,227 h60
Drill Drawing:
  circle w10: c-131.6,2848.33 r33.33
  lines w10: -164.93,2365 -164.93,2381.67 -148.27,2398.33 -164.93,2415 -164.93,2431.67 -148.27,2431.67 -131.6,2415 -114.93,2431.67 -98.27,2431.67 -98.27,2415 -114.93,2398.33 -98.27,2381.67 -98.27,2365 -114.93,2365 -131.6,2381.67 -148.27,2365 -164.93,2365 ; -164.93,2515 -98.27,2515 -98.27,2581.67 -164.93,2581.67 -164.93,2515 ; -164.93,2681.67 -148.27,2681.67 -131.6,2665 -114.93,2681.67 -98.27,2681.67 -114.93,2698.33 -98.27,2715 -114.93,2715 -131.6,2731.67 -148.27,2715 -164.93,2715 -148.27,2698.33 -164.93,2681.67 ; -164.93,3031.67 -98.27,3031.67 -131.6,2965 -164.93,3031.67 ; -164.93,3115 -131.6,3131.67 -98.27,3115 -114.93,3148.33 -98.27,3181.67 -131.6,3165 -164.93,3181.67 -148.27,3148.33 -164.93,3115 ; -164.93,3281.67 -148.27,3281.67 -148.27,3265 -114.93,3265 -114.93,3281.67 -98.27,3281.67 -98.27,3315 -114.93,3315 -114.93,3331.67 -148.27,3331.67 -148.27,3315 -164.93,3315 -164.93,3281.67
  lines w15: -224.72,2320 12893.59,2320 ; -224.72,3370 12893.59,3370 ; 326.15,2170 326.15,3520 ; 906,2170 906,3520 ; 2055.66,2170 2055.66,3520 ; 2561.54,2170 2561.54,3520 ; 3295.34,2170 3295.34,3520 ; 4794.89,2170 4794.89,3520 ; 5384.74,2170 5384.74,3520 ; 6130.54,2170 6130.54,3520 ; 6880.33,2170 6880.33,3520 ; 7734.09,2170 7734.09,3520 ; 9067.7,2170 9067.7,3520 ; 10401.31,2170 10401.31,3520 ; 11490.99,2170 11490.99,3520 ; -224.72,2170 12893.59,2170 12893.59,3520 -224.72,3520 -224.72,2170
  text "Symbol" at -134.72,3415 h72
  text "Count" at 371.15,3415 h72
  text "Hole Size" at 951,3415 h72
  text "Plated" at 2100.66,3415 h72
  text "Hole Type" at 2606.54,3415 h72
  text "Drill Layer Pair" at 3340.34,3415 h72
  text "Via/Pad" at 4839.89,3415 h72
  text "Pad Shape" at 5429.74,3415 h72
  text "Template" at 6175.54,3415 h72
  text "Description" at 6925.33,3415 h72
  text "Hole Tolerance (+)" at 7779.09,3415 h72
  text "Hole Tolerance (-)" at 9112.7,3415 h72
  text "Hole Length" at 10446.31,3415 h72
  text "Routed Path Length" at 11535.99,3415 h72
  text "1" at 371.15,3265 h60
  text "1.000mm (39.37mil)" at 951,3265 h60
  text "NPTH" at 2100.66,3265 h60
  text "Slot" at 2606.54,3265 h60
  text "Top Layer - Bottom Layer" at 3340.34,3265 h60
  text "Pad" at 4839.89,3265 h60
  text "Rounded" at 5429.74,3265 h60
  text "c0hn100_195" at 6175.54,3265 h60
  text "1.950mm (76.77mil)" at 10446.31,3265 h60
  text "0.950mm (37.40mil)" at 11535.99,3265 h60
  text "1" at 371.15,3115 h60
  text "1.900mm (74.80mil)" at 951,3115 h60
  text "NPTH" at 2100.66,3115 h60
  text "Slot" at 2606.54,3115 h60
  text "Top Layer - Bottom Layer" at 3340.34,3115 h60
  text "Pad" at 4839.89,3115 h60
  text "Rounded" at 5429.74,3115 h60
  text "c0hn190_195" at 6175.54,3115 h60
  text "1.950mm (76.77mil)" at 10446.31,3115 h60
  text "0.050mm (1.97mil)" at 11535.99,3115 h60
  text "4" at 371.15,2965 h60
  text "0.900mm (35.43mil)" at 951,2965 h60
  text "PTH" at 2100.66,2965 h60
  text "Round" at 2606.54,2965 h60
  text "Top Layer - Bottom Layer" at 3340.34,2965 h60
  text "Pad" at 4839.89,2965 h60
  text "(Mixed)" at 5429.74,2965 h60
  text "(Mixed)" at 6175.54,2965 h60
  text "-" at 10446.31,2965 h60
  text "-" at 11535.99,2965 h60
  text "4" at 371.15,2815 h60
  text "0.950mm (37.40mil)" at 951,2815 h60
  text "PTH" at 2100.66,2815 h60
  text "Round" at 2606.54,2815 h60
  text "Top Layer - Bottom Layer" at 3340.34,2815 h60
  text "Pad" at 4839.89,2815 h60
  text "(Mixed)" at 5429.74,2815 h60
  text "(Mixed)" at 6175.54,2815 h60
  text "-" at 10446.31,2815 h60
  text "-" at 11535.99,2815 h60
  text "4" at 371.15,2665 h60
  text "1.400mm (55.12mil)" at 951,2665 h60
  text "NPTH" at 2100.66,2665 h60
  text "Round" at 2606.54,2665 h60
  text "Top Layer - Bottom Layer" at 3340.34,2665 h60
  text "Pad" at 4839.89,2665 h60
  text "Rounded" at 5429.74,2665 h60
  text "c0hn140" at 6175.54,2665 h60
  text "-" at 10446.31,2665 h60
  text "-" at 11535.99,2665 h60
  text "4" at 371.15,2515 h60
  text "3.200mm (125.98mil)" at 951,2515 h60
  text "PTH" at 2100.66,2515 h60
  text "Round" at 2606.54,2515 h60
  text "Top Layer - Bottom Layer" at 3340.34,2515 h60
  text "Pad" at 4839.89,2515 h60
  text "Rounded" at 5429.74,2515 h60
  text "c0h320" at 6175.54,2515 h60
  text "-" at 10446.31,2515 h60
  text "-" at 11535.99,2515 h60
  text "193" at 371.15,2365 h60
  text "0.300mm (11.81mil)" at 951,2365 h60
  text "PTH" at 2100.66,2365 h60
  text "Round" at 2606.54,2365 h60
  text "Top Layer - Bottom Layer" at 3340.34,2365 h60
  text "Via" at 4839.89,2365 h60
  text "Rounded" at 5429.74,2365 h60
  text "v60h30m0mx0" at 6175.54,2365 h60
  text "-" at 10446.31,2365 h60
  text "-" at 11535.99,2365 h60
  text "211 Total" at 371.15,2215 h60
  text "Slot definitions :" at -134.72,2070.03 h60
  text "Routed Path Length" at 897.97,2070.03 h60
  text "= Calculated from tool start centre position to tool end centre position." at 2000.63,2070.03 h60
  text "Hole Length" at 897.97,1970.05 h60
  text "= Routed Path Length + Tool Size = Slot length as defined in the PCB layout" at 1590.77,1970.05 h60

## Dimensions
-222.44,1275.88 to 1442.91,1275.88 on Dimensions
1275.88,-222.44 to 1275.88,1442.91 on Dimensions

## Text inside footprints (layer, text, board x,y; h text height)
J3: Top Overlay "1" at 943.67,447 h39.37 r90
J4: Top Overlay "1" at 943.67,1163.72 h39.37 r90
J6: Bottom Overlay "1" at 1394.56,203.56 h30 r90